# Altium PCB LM386.PcbDoc
Units mil, origin at the board's own origin, x right, y up, seen from the top; angles counter-clockwise.
Board outline 2000 x 3000 mil, 2 copper layers (Top Layer, Bottom Layer); 24 components, 22 nets, 73 pads, 0 vias.
Unrouted connection lines stored in the file: 23.
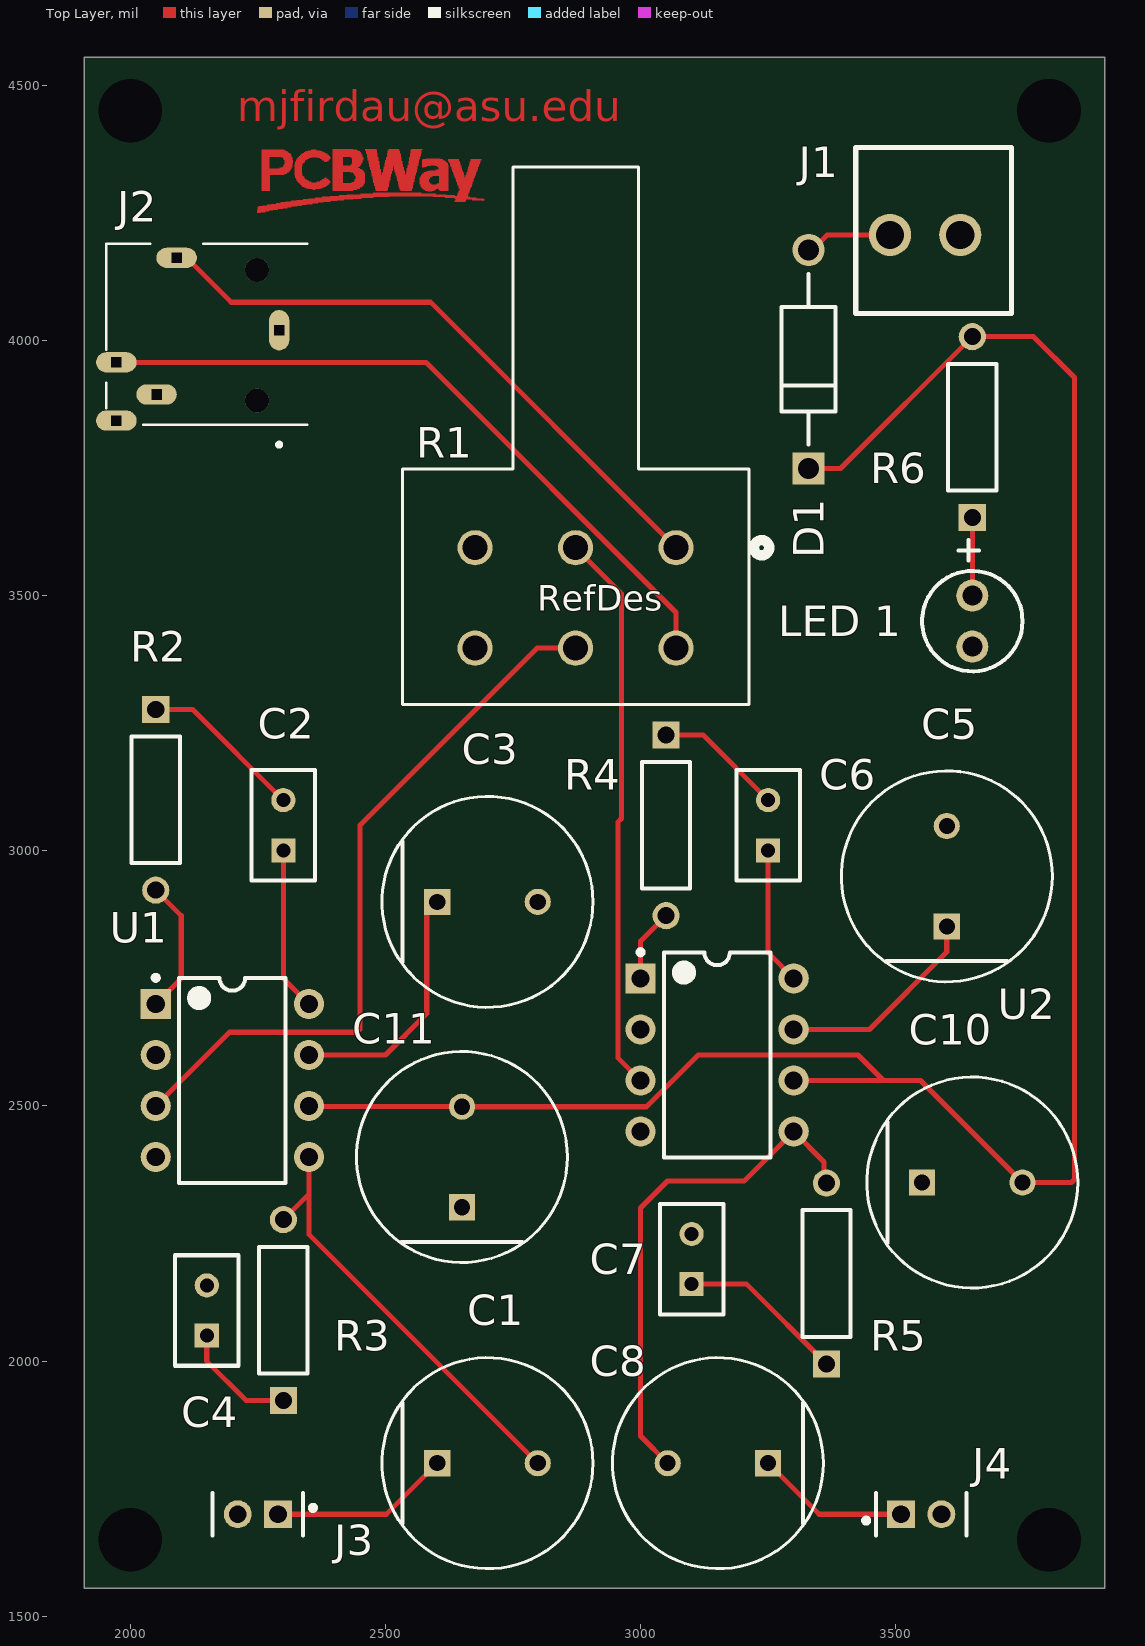
[diagram p0: Top Layer view]
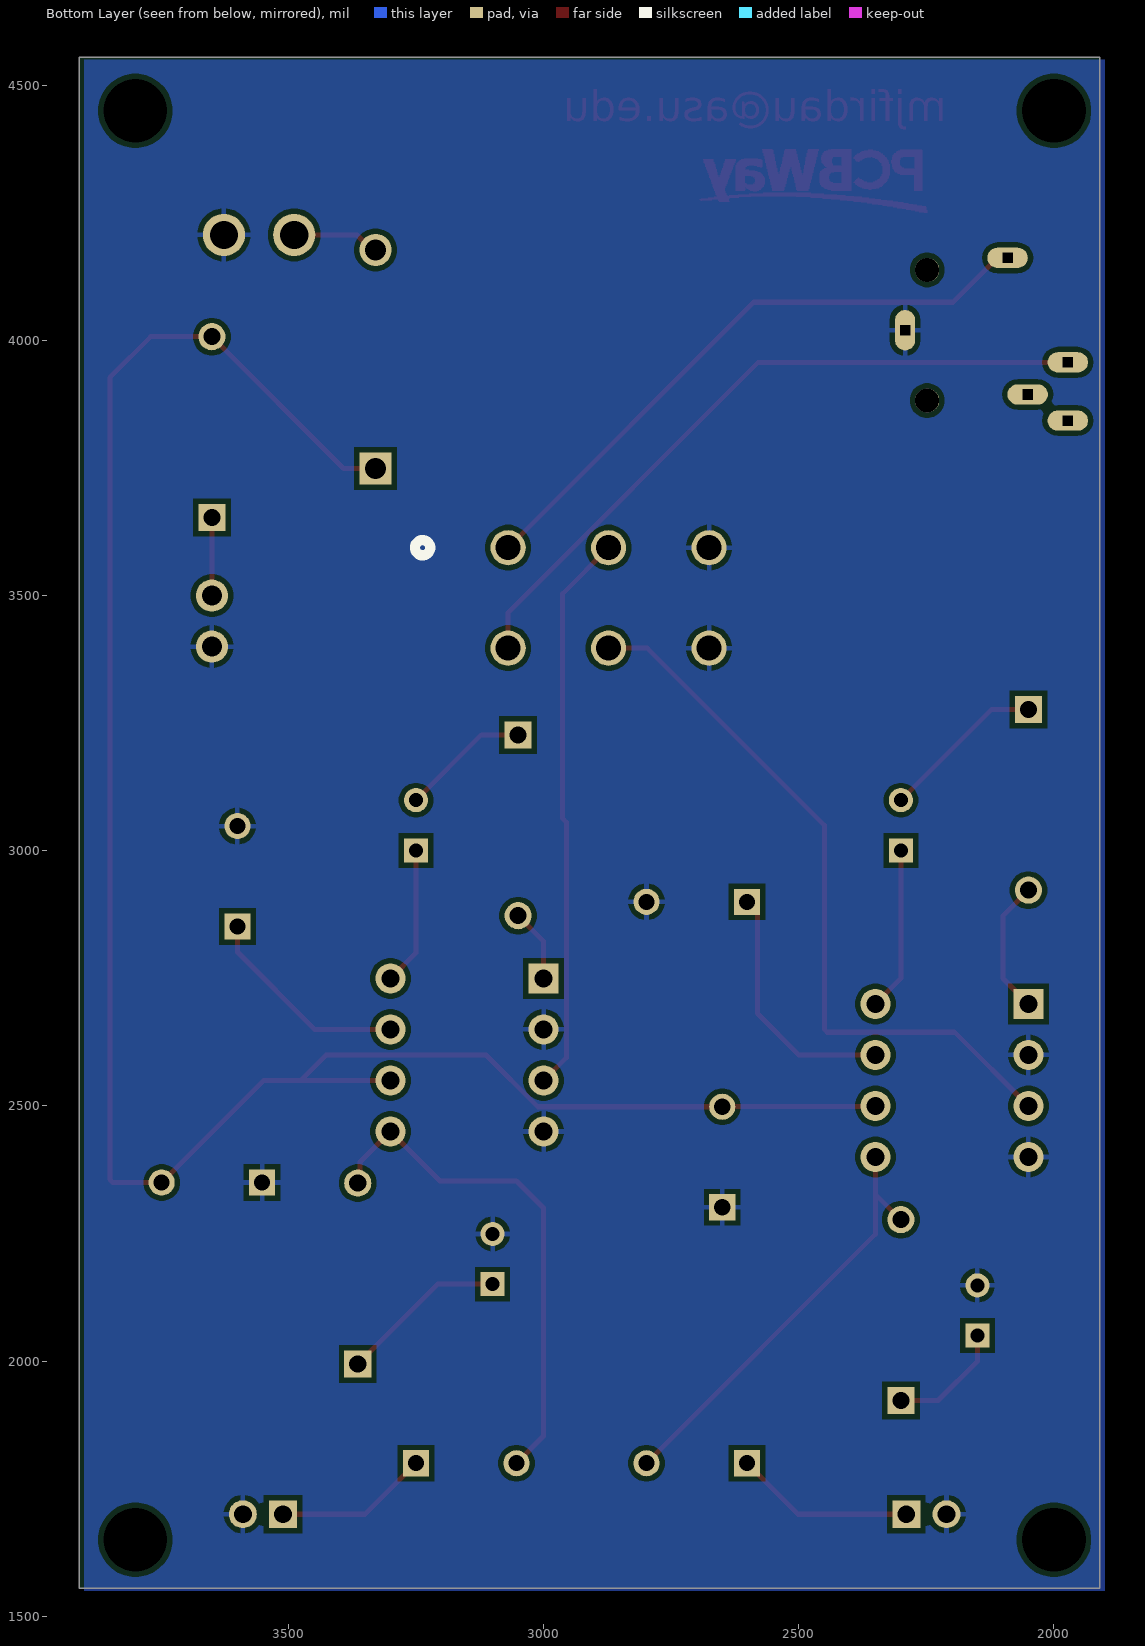
[diagram p1: Bottom Layer view, seen from below]
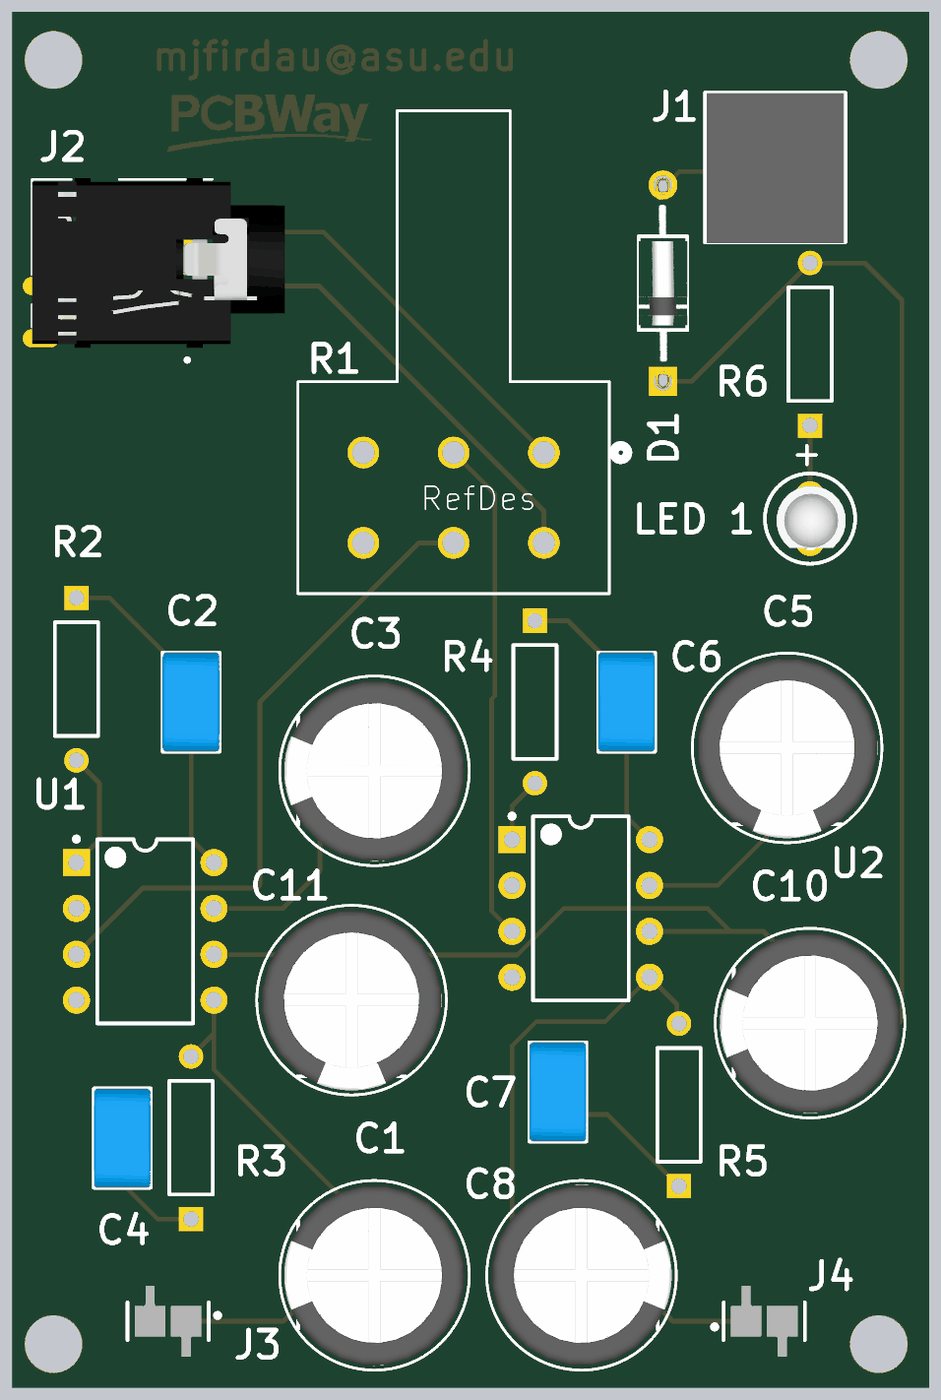
[diagram p2: 3D render of the assembled board from above, using the file's embedded part models]

## Layer stack, top to bottom
Top Solder: solder mask 0.4, Solder Resist, Dk 3.5
Top Layer: signal copper 1.4
Dielectric 1: dielectric 12.6, FR-4, Dk 4.8
Bottom Layer: signal copper 1.4
Bottom Solder: solder mask 0.4, Solder Resist, Dk 3.5

## Board outline
1910,1555 1910,4555 3910,4555 3910,1555

## Design rules (kind name [scope] priority, off if disabled: settings)
Clearance [All] p1: gap=10 ignorepadtopadclearanceinfootprint=FALSE
HoleSize [All] p1: absolutevalues=TRUE maxlimit=150 minlimit=1 maxpercent=80.000 minpercent=20.000
PolygonConnect [All] p1: connectstyle=Relief reliefconductorwidth=10 reliefentries=4 polygonreliefangle="90 Angle" airgapwidth=10
RoutingVias [All] p1: holewidth=28 width=50 viastyle="Through Hole" minholewidth=28 minwidth=50 maxholewidth=28 maxwidth=50
SolderMaskExpansion [All] p1: expansion=0 istentingtop=FALSE
SupplyNets "Schematic Supply Nets_1" [InNet('GND')] p1: voltage=0.000
SupplyNets "Schematic Supply Nets" [InNet('VCC')] p2: voltage=0.000
Width [All] p1: maxlimit=10 minlimit=10 preferedwidth=10
29 further rules are at their usual default settings.

## Components (designator, comment, footprint, x,y, rotation, side; value= is the part's Value field where it differs from the comment)
C1 "220uF" FP-RAD-TH-D_10_0_5-L_12_5-MFG 2700,1800 r0 top
C2 "10uF" FP-RHE2DB-MFG 2300,3050 r90 top
C3 "100uF" FP-RAD-TH-D_10_0_5-L_12_5-MFG 2700,2900 r0 top
C4 "47nF" FP-RHE2DB-MFG 2150,2099.21 r90 top
C5 "100uF" FP-RAD-TH-D_10_0_5-L_12_5-MFG 3600,2950 r90 top
C6 "10uF" FP-RHE2DB-MFG 3250,3050 r90 top
C7 "47nF" FP-RHE2DB-MFG 3100,2200 r90 top
C8 "220uF" FP-RAD-TH-D_10_0_5-L_12_5-MFG 3151.57,1800 r180 top
C10 "100uF" FP-RAD-TH-D_10_0_5-L_12_5-MFG 3650,2350 r0 top
C11 "100uF" FP-RAD-TH-D_10_0_5-L_12_5-MFG 2650,2400 r90 top
D1 "1N4001-E3/73" FP-1N4001-E3-73-MFG 3329.24,3963.35 r90 top value=15pF
J1 "TERM BLK" "Term Block" 3488.7,4206.87 r0 top
J2 "54-00175" TENSILITY_54-00175 2150,4012.23 r90 top
J3 "TMM-102-04-G-S" FP-TMM-102-04-G-S-MFG 2250,1700 r180 top
J4 "TMM-102-04-G-S" FP-TMM-102-04-G-S-MFG 3550,1700 r0 top
"LED 1" "Green LED" "Green LED" 3650,3500 r270 top
R1 "PDB182-K415K-104B3" POT_PDB182_BRN 3069.51,3593.88 r0 top
R2 "1.2k" RESA60-630X240 2050,3100 r270 top
R3 "10" RESA60-630X240 2300,2100 r90 top
R4 "1.2k" RESA60-630X240 3050,3050 r270 top
R5 "10" RESA60-630X240 3364.16,2171.69 r90 top
R6 "470" RESA60-630X240 3650,3830.19 r90 top
U1 "LM386N-1/NOPB" P0008A 2200,2550 r0 top
U2 "LM386N-1/NOPB" P0008A 3150,2600 r0 top

## Footprints (in the part's own frame and the unit in brackets; to place one, negate y for a bottom-side part, rotate by r counter-clockwise, add the part's x,y. Pads: shape width x height; smd on the part's side, far side on the other; paste and mask are expansions set on the pad)
FP-1N4001-E3-73-MFG [mm]
  rect 1.6x1.6 hole 1.05 paste-2539.97 mask+0: 1(-5.438,0)
  round 1.6 hole 1.05 paste-2539.97 mask+0: 2(5.438,0)
  silkscreen extent -4.24,-1.35 4.24,1.35, body extent -6.34,-1.45 6.34,1.45, height 0.25
FP-RAD-TH-D_10_0_5-L_12_5-MFG [mm]
  rect 1.3x1.3 hole 0.8 paste-2539.97 mask+0: 1(-2.5,0)
  round 1.3 hole 0.8 paste-2539.97 mask+0: 2(2.5,0)
  silkscreen extent -5.25,-5.25 5.25,5.25, body extent -5.35,-5.35 5.35,5.35, height 0.25
FP-RHE2DB-MFG [mm]
  rect 1.2x1.2 hole 0.7 paste-2539.97 mask+0: 1(-1.25,0)
  round 1.2 hole 0.7 paste-2539.97 mask+0: 2(1.25,0)
  silkscreen extent -2.75,-1.58 2.75,1.58, body extent -2.85,-1.68 2.85,1.68, height 0.25
FP-TMM-102-04-G-S-MFG [mm]
  rect 1.39x1.39 hole 0.89 paste-2539.97 mask+0: 1(-1,0)
  round 1.39 hole 0.89 paste-2539.97 mask+0: 2(1,0)
  silkscreen extent -2.87,-1.05 2.25,1.05
"Green LED" [mm]
  round 1.6 hole 1: 1(0,0) 2(2.54,0)
  silkscreen extent -2.76,-2.5 3.77,2.5, body extent -0.54,-1.85 3.03,1.98, height 5.3
P0008A [mm] "DIP, 8-Leads, Body 10.15x6.6mm, Pitch 2.54mm"
  rect 1.5x1.5 hole 0.9: 1(-3.81,3.81)
  round 1.5 hole 0.9: 2(-3.81,1.27) 3(-3.81,-1.27) 4(-3.81,-3.81) 5(3.81,-3.81) 6(3.81,-1.27) 7(3.81,1.27) 8(3.81,3.81)
  silkscreen extent -3.93,-5.1 2.65,5.23, body extent -3.95,-5.07 3.95,5.07, height 5.08
POT_PDB182_BRN [mil]
  round 69 / inner round 60 / far side round 69 hole 49 paste-99999 mask+0: 1(0,0) 1'(0,-196.85) 2(-196.85,0) 2'(-196.85,-196.85) 3(-393.7,0) 3'(-393.7,-196.85)
  silkscreen extent -536,-307 183,746
RESA60-630X240 [mm] "Axial Resistor, 2-Leads, Dia 2.4mm, Body Length 6.3mm"
  rect 1.35x1.35 hole 0.85: 1(-4.5,0)
  round 1.35 hole 0.85: 2(4.5,0)
  silkscreen extent -3.15,-1.2 3.15,1.2, body extent -3.15,-1.2 3.15,1.2, height 2.4
TENSILITY_54-00175 [mm]
  oval 2.016x1.008 hole 0.5 square: 1(0.2,-3.6)
  oval 1.008x2.016 hole 0.5 square: 2(-1.4,4.5) 3(3.8,1.5) 4(-3,2.5) 5(-4.3,4.5)
  round 1.2 hole 1.2 unplated: ""(-3.3,-2.5) ""(3.2,-2.5)
  silkscreen extent -5.6,-5 4.5,5, body extent -4.83,-9 4.57,5, height 5.25
"Term Block" [mm]
  round 2.1 hole 1.4: 1(0,0) 2(3.5,0)
  silkscreen extent -1.7,-3.91 6.05,4.34, body extent -1.63,-3.96 5.97,4.34, height 12.9

## Part data
C1 C3 C5 C8 C10 C11: library part CMP-05427-001782-1, "Aluminum Electrolytic Capacitors (Radial Lead Type) 330uF ±20% 35V", Case/Package=Radial, RoHS Compliant=Yes
C2 C4 C6 C7: library part CMP-06035-033660-1, "Ceramic Capacitor Automotive 1uF ±10% 50V X8L Radial", Capacitance=1uF, Dielectric=X8L, Max Operating Temperature=150°C, Min Operating Temperature=-55°C, Tolerance=10%, Voltage Rating=50V, Lead Pitch=2.5mm, REACH SVHC="No SVHC", Voltage Rating (DC)=50V
D1: library part CMP-02540-000001-1, "DIODE GEN PURP 50V 1A DO204AL", Capacitance=15pF, Forward Current=1A, Manufacturer=Vishay, Max Junction Temp=+150°C, Max Repetitive Reverse Voltage=50V, Max Surge Forward Current=30A, Peak Reverse Current=5uA, Temperature="-50°C to +150°C", Temperature Range Low=-50°C, Automotive=No, Category=Diode, ComponentLink2Description=Datasheet, ComponentLink2URL=http://www.vishay.com/docs/88503/1n4001.pdf, Device Class L1="Discrete Semiconductors", Device Class L2=Diodes, Device Class L3="Rectifier Diodes", Digikey Description="DIODE GEN PURP 50V 1A DO204AL", Height=2.7mm, Ipc Land Pattern Name=DIOPA1088W105L520D270, Lead Free=Yes, Manufacturer Part Number=1N4001-E3/73, Mouser Description="Rectifiers Vr/50V Io/1A", Octopart=https://octopart.com/1n4001-e3%2F73-vishay-42330130, Package=1N4001-E3/73, Reverse Voltage=50V, RoHS=TRUE, Temperature Range High=+150°C
J2: Package=None, Availability=Unavailable, MF="{'manufacturer': u'Tensility International Corp'}", MP=54-00175, Price=None
J3 J4: library part CMP-02766-001609-1, "2MM TERMINAL STRIP", Housing Color=Black, Max Current Rating=3.9A, Max Operating Temperature=125°C, Max Voltage Rating (AC)=500V, Min Operating Temperature=-55°C, Contact Material=Bronze, Contact Plating=Gold, Depth=1.97mm, Gender=Male, Housing Material=Polymer, Length=4mm, Number of Contacts=2, Number of Rows=1, Orientation=Straight, Packaging=Bulk, Pitch=2mm, Radiation Hardening=No, RoHS Compliant=Yes, Termination=Solder
R1: "Description", Manufacturer_Name="Bourns Electronics", Copyright="Copyright (C) 2025 Ultra Librarian. All rights reserved.", Manufacturer_Part_Number=PDB182-K415K-104B3, RefDes=RefDes, Type=Type
R2 R3 R4 R5 R6: library part CMP-1659-00071-1, "Axial Resistor, 100 Ohm, +/- 1%, 0.25 W, -55 to 155 degC, 2-Pin THD, RoHS, Bulk", Case\Package=Axial, Max Operating Temperature="155 degC", Min Operating Temperature="-55 degC", Package Quantity=200, Power Rating="250 mW", Resistance="4.75 kohm", Tolerance=1%, Type (Resistor)="Metal Film", Voltage Rating="250 V", ComponentLink1Description="Manufacturer URL", ComponentLink1URL=http://www.yageo.com/, ComponentLink2Description=Datasheet, ComponentLink2URL=http://www.yageo.com/documents/recent/Yageo%20LR_MFR_2013.pdf, DatasheetVersion=Apr-13, Length="0.248 inch", Mount="Through Hole", PackageDescription="2-Pin Axial Lead, Dia 2.4 mm, Body Length 6.3 mm", PackageReference=MFR-25, Packaging=Bulk, RoHSCompliant=true
U1 U2: library part CMP-0057-00052-4, "Low Voltage Audio Power Amplifier, 8-pin MDIP, Pb-Free", Manufacturer="Texas Instruments", PackageTopMarking=NSUZXYTTE#*LM*386N-1, PowerWise=N, Code_JEDEC=MS-001-BA, ComponentLink1Description="Datasheet URL", ComponentLink1URL=http://www.ti.com/general/docs/lit/getliterature.tsp?genericPartNumber=LM386&fileType=pdf, CompType="Audio IC", PackageDescription="MDIP, .365 x .250 x .130in, 8 Lead, .100in Pitch", PackageReference=P0008A, PinCount=8, RoHS=Y

## Free pads (board coordinates)
  round 60 hole 125: H1(2000,4450) H2(3800,4450) H3(3800,1650) H4(2000,1650)

## Nets (pads, with @x,y where several pads share a name; then routed paths per layer and width w, separated by ;. In a path a pad name is that pad's centre, name@x,y a point inside that pad or via, vN(x,y) a via of type N, cw(c..) or ccw(c..) an arc to the next point about the centre after c; other vN are vias at no path point)
GND: "LED 1.2" C3.2 C4.2 C5.2 C7.2 C10.1 C11.1 J1.2 J2.1 J3.2 J4.2 R1.3 R1.3' U1.2 U1.4 U2.2 U2.4
NetC1_1: C1.1 J3.1 | length 353.6
  Top Layer w10: J3.1 2501.57,1700 C1.1
NetC1_2: C1.2 R3.2 U1.5 | length 856.5
  Top Layer w10: R3.2 2350,2327.17 ; U1.5 2350,2248.43 C1.2
NetC2_1: C2.1 U1.8 | length 321.5
  Top Layer w10: C2.1 2300,2750 U1.8
NetC2_2: C2.2 R2.1 | length 323.7
  Top Layer w10: R2.1 2122.05,3277.17 C2.2
NetC3_1: C3.1 U1.7 | length 492.1
  Top Layer w10: U1.7 2500,2600 2580.98,2680.98 2580.98,2879.41 C3.1
NetC4_1: C4.1 R3.1 | length 232
  Top Layer w10: C4.1 2150,2000 2227.17,1922.83 R3.1
NetC5_1: C5.1 U2.7 | length 412.8
  Top Layer w10: U2.7 3448.43,2650 3600,2801.57 C5.1
NetC6_1: C6.1 U2.8 | length 271.5
  Top Layer w10: C6.1 3250,2800 U2.8
NetC6_2: C6.2 R4.1 | length 253
  Top Layer w10: R4.1 3122.05,3227.17 C6.2
NetC7_1: C7.1 R5.1 | length 328.9
  Top Layer w10: C7.1 3207.9,2150.79 R5.1
NetC8_1: C8.1 J4.1 | length 302.1
  Top Layer w10: C8.1 3350,1700 J4.1
NetC8_2: C8.2 R5.2 U2.5 | length 1011.9
  Top Layer w10: C8.2 3000,1853.15 3000,2300 3052.91,2352.91 3202.91,2352.91 U2.5 3359.57,2390.43 3359.57,2353.45 R5.2
NetD1_2: D1.2 J1.1 | length 171.6
  Top Layer w10: D1.2 3336.16,4177.45 3365.58,4206.87 J1.1
NetJ2_2: J2.2 R1.1' | length 1369.7
  Top Layer w10: J2.2 2579.43,3957.11 3069.51,3467.04 R1.1'
NetJ2_3: J2.3 R1.1 | length 1213.8
  Top Layer w10: J2.3 2110.79,4161.84 2197.83,4074.79 2588.6,4074.79 R1.1
"NetLED 1_1": "LED 1.1" R6.1 | length 153
  Top Layer w10: 3650,3500 R6.1
NetR1_2: R1.2 U2.3 | length 1102.6
  Top Layer w10: R1.2 2962.66,3503.88 2962.66,3063.33 2955.47,3056.14 2955.47,2594.53 U2.3
NetR1_2': R1.2' U1.3 | length 1428.3
  Top Layer w10: U1.3 2194.53,2644.53 2444.14,2644.53 2450,2650.39 2450,3050 2797.03,3397.03 R1.2'
NetR2_2: R2.2 U1.1 | length 264.3
  Top Layer w10: U1.1 2100,2750 2100,2872.83 R2.2
NetR4_2: R4.2 U2.1 | length 143.5
  Top Layer w10: U2.1 3000,2822.83 R4.2
VCC: C10.2 C11.2 D1.1 R6.2 U1.6 U2.6 | length 4057
  Top Layer w10: U1.6 2350.79,2499.21 2649.21,2499.21 C11.2 3011.4,2498.43 3112.97,2600 3426.07,2600 3476.07,2550 ; U2.6 3476.07,2550 ; D1.1 3391.91,3749.26 R6.2 3769.81,4007.35 3850,3927.17 3850,3534.34 3850,2748.68 3850,2355.86 3844.14,2350 C10.2 3548.43,2550 3476.07,2550
pads on no net: J2. J2.4 J2.5

## Polygon pours and split planes (outlines as drawn)
GND on Bottom Layer "GND_L02_P000" (solid, pour order 0): 1900,4550 3900,4550 3900,1550 1900,1550

## Other copper
Top Layer:
  region: 2301.56,4371.88 2304.69,4371.88 2304.69,4370.31 2307.81,4370.31 2307.81,4368.75 2309.38,4368.75 2309.38,4367.19 2312.5,4367.19 2312.5,4365.62 2314.06,4365.62 2314.06,4362.5 2315.62,4362.5 2315.62,4359.38 2317.19,4359.38 2317.19,4353.12 2318.75,4353.12 2318.75,4346.88 2317.19,4346.88 2317.19,4339.06 2315.62,4339.06 2315.62,4335.94 2314.06,4335.94 2314.06,4334.38 2312.5,4334.38 2312.5,4331.25 2310.94,4331.25 2310.94,4329.69 2307.81,4329.69 2307.81,4328.12 2306.25,4328.12 2306.25,4326.56 2301.56,4326.56 2301.56,4325 2273.44,4325 2273.44,4293.75 2257.81,4293.75 2257.81,4360.94 2257.81,4362.5 2257.81,4373.44 2301.56,4373.44 hole: 2295.31,4359.38 2273.44,4359.38 2273.44,4337.5 2292.19,4337.5 2292.19,4339.06 2296.88,4339.06 2296.88,4340.62 2298.44,4340.62 2298.44,4342.19 2300,4342.19 2300,4345.31 2301.56,4345.31 2301.56,4353.12 2300,4353.12 2300,4356.25 2298.44,4356.25 2298.44,4357.81 2295.31,4357.81
  region: 177 vertices and 0 holes, not listed, extent 2321.88,4295.31 2392.19,4373.44
  region: 2607.81,4354.69 2612.5,4354.69 2612.5,4353.12 2615.62,4353.12 2615.62,4351.56 2617.19,4351.56 2617.19,4350 2618.75,4350 2618.75,4348.44 2620.31,4348.44 2620.31,4346.88 2621.88,4346.88 2621.88,4343.75 2623.44,4343.75 2623.44,4293.75 2606.25,4293.75 2606.25,4295.31 2604.69,4295.31 2604.69,4300 2603.12,4300 2603.12,4298.44 2601.56,4298.44 2601.56,4296.88 2598.44,4296.88 2598.44,4295.31 2595.31,4295.31 2595.31,4293.75 2590.62,4293.75 2590.62,4292.19 2582.81,4292.19 2582.81,4293.75 2578.12,4293.75 2578.12,4295.31 2575,4295.31 2575,4296.88 2573.44,4296.88 2573.44,4298.44 2571.88,4298.44 2571.88,4300 2570.31,4300 2570.31,4301.56 2568.75,4301.56 2568.75,4306.25 2567.19,4306.25 2567.19,4318.75 2568.75,4318.75 2568.75,4321.88 2570.31,4321.88 2570.31,4323.44 2571.88,4323.44 2571.88,4326.56 2575,4326.56 2575,4328.12 2576.56,4328.12 2576.56,4329.69 2581.25,4329.69 2581.25,4331.25 2585.94,4331.25 2585.94,4332.81 2598.44,4332.81 2598.44,4334.38 2604.69,4334.38 2604.69,4339.06 2603.12,4339.06 2603.12,4340.62 2601.56,4340.62 2601.56,4342.19 2596.88,4342.19 2596.88,4343.75 2587.5,4343.75 2587.5,4342.19 2581.25,4342.19 2581.25,4340.62 2576.56,4340.62 2576.56,4339.06 2571.88,4339.06 2571.88,4353.12 2573.44,4353.12 2573.44,4354.69 2579.69,4354.69 2579.69,4356.25 2607.81,4356.25 hole: 2604.69,4321.88 2593.75,4321.88 2593.75,4320.31 2590.62,4320.31 2590.62,4318.75 2587.5,4318.75 2587.5,4315.62 2585.94,4315.62 2585.94,4310.94 2587.5,4310.94 2587.5,4307.81 2590.62,4307.81 2590.62,4306.25 2600,4306.25 2600,4307.81 2603.12,4307.81 2603.12,4309.38 2604.69,4309.38
  region: 2435.94,4373.44 2443.75,4373.44 2443.75,4371.88 2446.88,4371.88 2446.88,4370.31 2450,4370.31 2450,4368.75 2451.56,4368.75 2451.56,4367.19 2453.12,4367.19 2453.12,4364.06 2454.69,4364.06 2454.69,4359.38 2456.25,4359.38 2456.25,4357.81 2456.25,4356.25 2456.25,4353.12 2454.69,4353.12 2454.69,4348.44 2453.12,4348.44 2453.12,4345.31 2451.56,4345.31 2451.56,4343.75 2450,4343.75 2450,4342.19 2448.44,4342.19 2448.44,4340.62 2446.88,4340.62 2446.88,4339.06 2445.31,4339.06 2445.31,4337.5 2450,4337.5 2450,4335.94 2453.12,4335.94 2453.12,4334.38 2454.69,4334.38 2454.69,4332.81 2456.25,4332.81 2456.25,4331.25 2457.81,4331.25 2457.81,4328.12 2459.38,4328.12 2459.38,4307.81 2457.81,4307.81 2457.81,4304.69 2456.25,4304.69 2456.25,4303.12 2454.69,4303.12 2454.69,4301.56 2453.12,4301.56 2453.12,4300 2450,4300 2450,4298.44 2448.44,4298.44 2448.44,4296.88 2443.75,4296.88 2443.75,4295.31 2435.94,4295.31 2435.94,4293.75 2396.88,4293.75 2396.88,4375 2435.94,4375 hole: 2429.69,4329.69 2417.19,4329.69 2417.19,4309.38 2432.81,4309.38 2432.81,4310.94 2437.5,4310.94 2437.5,4312.5 2439.06,4312.5 2439.06,4317.19 2440.62,4317.19 2440.62,4321.88 2439.06,4321.88 2439.06,4325 2437.5,4325 2437.5,4326.56 2435.94,4326.56 2435.94,4328.12 2429.69,4328.12 hole: 2431.25,4359.38 2417.19,4359.38 2417.19,4343.75 2431.25,4343.75 2431.25,4345.31 2432.81,4345.31 2432.81,4346.88 2434.38,4346.88 2434.38,4356.25 2432.81,4356.25 2432.81,4357.81 2431.25,4357.81
  region: 226 vertices and 0 holes, not listed, extent 2248.44,4250 2693.75,4354.69
  region: 163 vertices and 0 holes, not listed, extent 2460.94,4293.75 2571.88,4375
  text "mjfirdau@asu.edu" at 2210,4429.99 h60

## Silkscreen, mask and mechanical layers (free items; w line width, h text height)
Mechanical 1:
  the board outline again, w10

## Text inside footprints (layer, text, board x,y; h text height)
J2: Top 3D Body "PCB EDGE" at 2335.04,4209.08 h39.37 r90
R1: Top 3D Body "RefDes2" at 2785.16,3470.46 h50; Top Overlay "RefDes" at 2797.66,3470.46 h50